# Altium PCB Power_vac.PcbDoc (part 3 of 5)
Units mm, origin at the board's own origin, x right, y up, seen from the top; angles counter-clockwise.
Board outline 180 x 212 mm, 4 copper layers (Top Layer, Int1 (GND), Int2 (PWR), Bottom Layer), stack 2.01 mm thick; 296 components, 149 nets, 798 pads, 522 vias.
Unrouted connection lines stored in the file: 1.
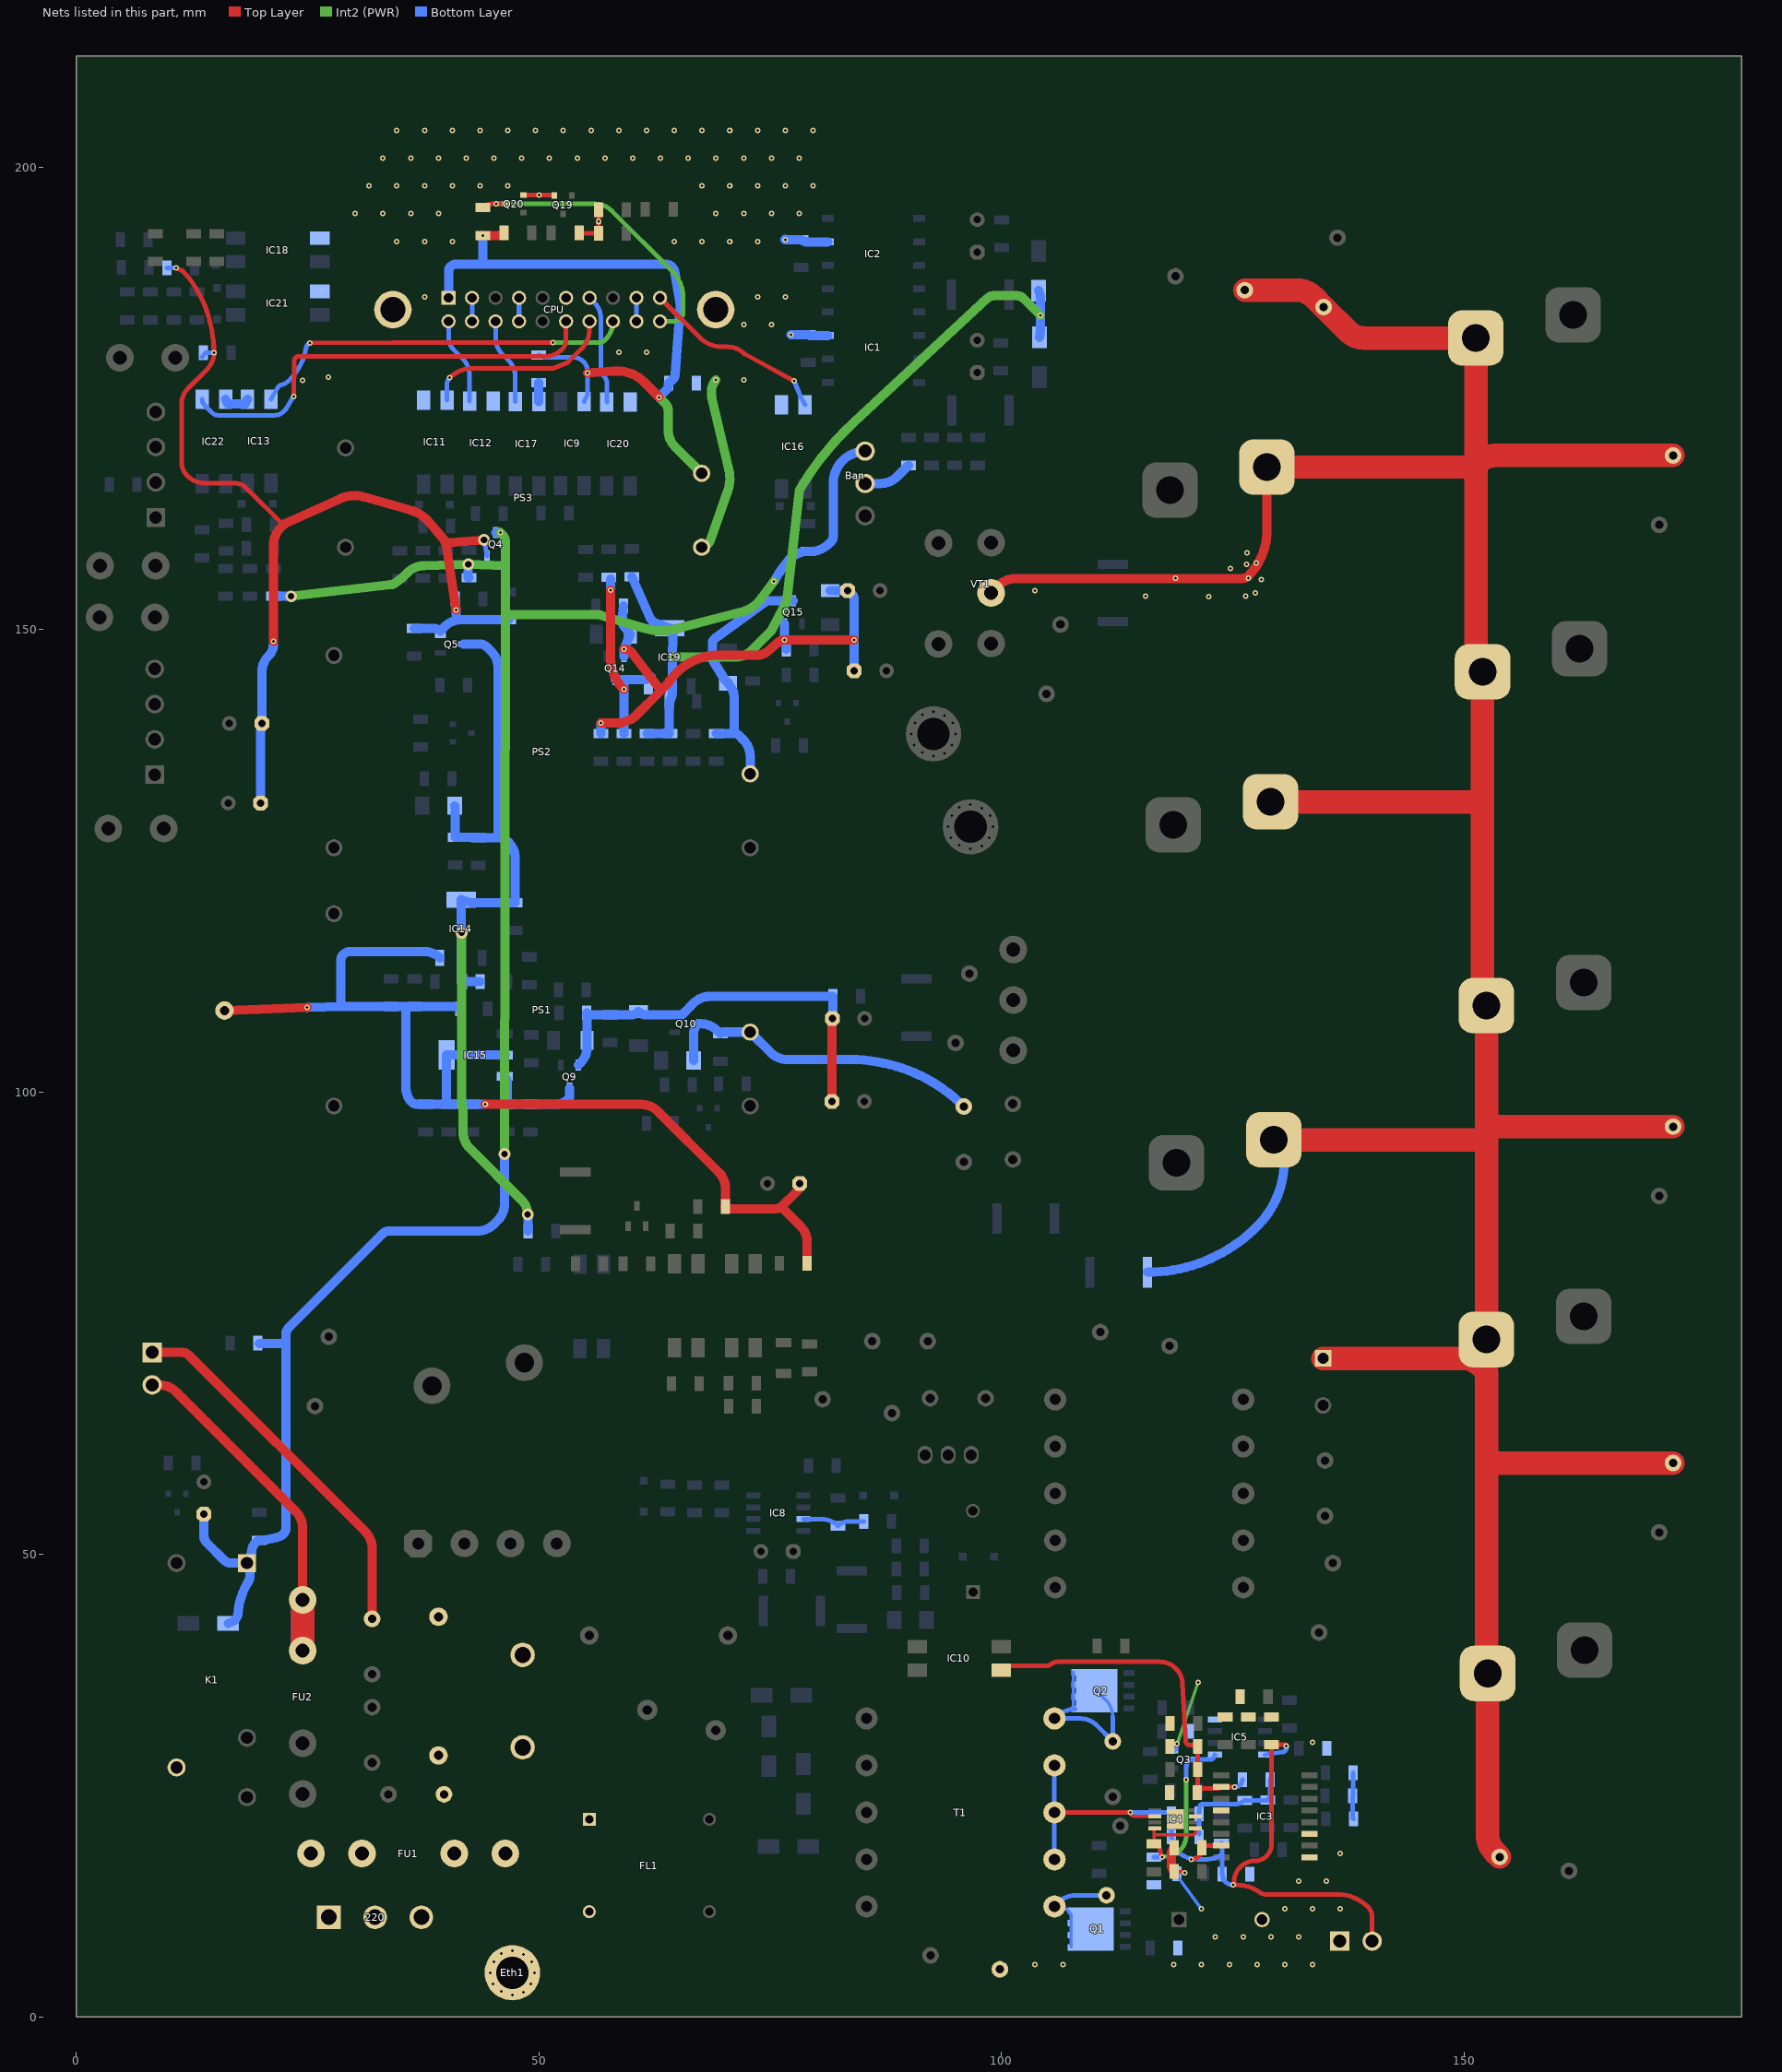
[diagram p4: the nets of this part, all layers, seen from the top]

## Via types
v1: diameter 0.6/0.6/0.6/0.6 (per signal layer), hole 0.3, Top Layer to Bottom Layer, tented both sides, 277 vias
v2: diameter 0.6, hole 0.3, Top Layer to Bottom Layer, tented both sides, 239 vias
v3: diameter 1.27, hole 0.711, Top Layer to Bottom Layer, 6 vias

## Nets (pads, with @x,y where several pads share a name; then routed paths per layer and width w, separated by ;. In a path a pad name is that pad's centre, name@x,y a point inside that pad or via, vN(x,y) a via of type N, cw(c..) or ccw(c..) an arc to the next point about the centre after c; other vN are vias at no path point) (continued)
Fod_3184_18v: (continued)
  Bottom Layer w1: v2(24.925,109.125) 24.963,109.125 ccw(c24.96,110.125) 24.99,109.125 24.992,109.126 28.808,109.249 ; 28.55,109.25 28.55,114.176 cw(c29.55,114.175) 29.55,115.175 37.645,115.175 cw(c37.645,112.87) IC14.3@39.275,114.5 ; 28.809,109.249 28.812,109.249 cw(c28.851,108.25) 28.851,109.25 C60.2@34.025,109.25 35.6,109.25 ; C59.2@36.125,109.25 40.786,109.25 cw(c40.786,108.311) R62.2@41.45,108.975 ; C59.2@36.525,109.25 35.6,109.25 ; v2@44.14,98.675 C65.2@42.751,98.675 C64.2@40.25,98.675 ; IC15.2@46.3,104 IC15.4@40,104 40,99.279 ccw(c40.854,99.279) C64.2@40.25,98.675 ; 35.6,109.25 35.6,100.651 35.6,100.552 ccw(c38.255,100.552) 36.005,99.142 ccw(c36.852,99.675) 36.852,98.675 37.45,98.675 C63.2@37.75,98.675 C64.2@40.25,98.675
Gate: IC8.7 R35.1 R38.1 | length 6.8
  Bottom Layer w0.5: IC8.7@78.587,53.815 80.538,53.815 cw(c80.538,51.288) R35.1@82.325,53.075 cw(c83.472,51.928) 83.472,53.55 R38.1@85.1,53.55
GND_akum: Buster_1.1 C23.2 C24.1 C25.2 C26.2 C27.2 C28.1 C29.2 C30.2 C31.1 C32.2 C33.2 C34.2 C35.2 C36.1 C37.2 C38.2 C39.2 C92.1 IC3.1 IC3.3 IC3.12 IC4.3 IC4.9 IC5.4 Q3.2 R11.1 R13.2 R16.2 R17.1 R18.1 R23.1 R24.1 | length 36.1
  Top Layer w0.35: C36.1@118.225,29.226 118.55,29.5 v2(118.975,29.5) ; C24.1@118.675,15.7 119.505,15.7 cw(c119.505,15.35) 119.752,15.598 v2(119.8,15.55)
  Top Layer w1: C24.1@118.675,15.7 118.641,15.734 cw(c119.35,16.439) 118.35,16.439 118.35,17.536 cw(c119.35,17.536) 118.642,18.242 C26.2@118.675,18.275
  Int2 (PWR) w0.35: v2(118.975,29.5) v2(121.25,36.15)
  Bottom Layer w0.35: Q3.2@118.75,28.75 118.925,28.875 v2(118.975,29.5) ; v2@119.778,15.528 119.275,15.528 C25.2@118.95,15.475 119.275,14.85 v1(121.625,11.65)
  Bottom Layer w0.5: C30.2@121.377,19.747 121.377,22.225 121.459,22.85 cw(c121.727,22.625) 121.727,22.975 125.274,22.975 ccw(c125.274,24.426) 125.803,23.075 C34.2@126.3,23.4 128.68,23.4 ccw(c128.68,23.571) C35.2@128.8,23.45 ccw(c128.224,24.026) 129.039,24.026 R16.2@129.039,25.65 ; C32.2@138.025,26.376 138.025,23.996 cw(c137.854,23.996) R17.1@137.975,23.875 137.975,21.556 ccw(c138.231,21.556) C28.1@138.05,21.375
  other v1: 103.625,5.65 106.625,5.65 118.625,5.65 121.625,5.65 124.625,5.65 127.625,5.65 130.625,5.65 133.625,5.65 123.125,8.65 126.125,8.65 129.125,8.65 132.125,8.65 130.625,11.65 133.625,11.65 136.625,11.65 132.125,14.65 135.125,14.65 136.625,17.65 133.625,29.65
GND_digit: C16.1 C85.1 C87.1 CPU.3 CPU.4 CPU.7 CPU.8 CPU.11 CPU.17 CPU.18 CPU.MH1 CPU.MH2 IC1.3 IC2.3 IC11.3 IC12.2 IC13.3 IC16.3 IC17.2 IC18.3 IC20.2 IC21.3 IC22.2 PS3.4 Q19.2 Q20.2 R2.1 R6.1 R88.1 R95.1 | length 48.7
  Top Layer w0.5: Q20.2@48.3,196.975 51.529,196.975 cw(c51.529,196.804) Q19.2@51.65,196.925 ; R95.1@54.325,192.9 ccw(c54.446,193.021) 54.446,192.85 C87.1@56.45,192.85 R88.1@56.45,195.4
  Int2 (PWR) w1: PS3.4@67.575,158.9 68.033,159.119 ccw(c67.601,160.021) 68.544,159.688 70.394,164.935 ccw(c66.471,166.319) 70.519,167.28 68.691,175.002 cw(c69.664,175.232) 68.664,175.232 68.664,175.862 cw(c70.238,175.862) v1(69.125,176.975)
  Bottom Layer w0.5: CPU.4@42.76,183.335 CPU.3@42.76,185.875 ; CPU.8@47.84,183.335 CPU.7@47.84,185.875 ; CPU.18@60.54,183.335 CPU.17@60.54,185.875
  Bottom Layer w1: IC22.2@16.12,174.9 16.345,174.4 18.255,174.4 IC13.3@18.48,174.925 ; C16.1@49.975,176.7 49.975,175.2 IC17.2@49.981,174.65 ; v2@76.575,192.2 ccw(c76.635,192.26) v2(76.635,192.175) R6.1@78.35,192.175 ; v2(77.25,181.9) R2.1@79.1,181.9 ccw(c79.353,182.153) 79.353,181.795 IC1.3@81.2,181.795 ; R6.1@78.35,192.175 ccw(c79.017,192.92) 79.015,191.92 IC2.3@81.2,191.92
  other v1: 24.424,176.947 72.125,176.975 27.236,177.295 58.625,179.975 61.625,179.975 72.125,182.975 75.125,182.975 37.625,185.975 73.625,185.975 76.625,185.975 34.625,191.975 37.625,191.975 40.625,191.975 64.625,191.975 67.625,191.975 70.625,191.975 73.625,191.975 30.125,194.975 33.125,194.975 36.125,194.975 39.125,194.975 69.125,194.975 72.125,194.975 75.125,194.975 78.125,194.975 31.625,197.975 34.625,197.975 37.625,197.975 40.625,197.975 43.625,197.975 46.625,197.975 67.625,197.975 70.625,197.975 73.625,197.975 76.625,197.975 79.625,197.975 33.125,200.975 36.125,200.975 39.125,200.975 42.125,200.975 45.125,200.975 48.125,200.975 51.125,200.975 54.125,200.975 57.125,200.975 60.125,200.975 63.125,200.975 66.125,200.975 69.125,200.975 72.125,200.975 75.125,200.975 78.125,200.975 34.625,203.975 37.625,203.975 40.625,203.975 43.625,203.975 46.625,203.975 49.625,203.975 52.625,203.975 55.625,203.975 58.625,203.975 61.625,203.975 64.625,203.975 67.625,203.975 70.625,203.975 73.625,203.975 76.625,203.975 79.625,203.975
  other v2: 56.45,194.125 50,196.975